# Altium PCB Optical_Sensor.PcbDoc
Units mil, origin at the board's own origin, x right, y up, seen from the top; angles counter-clockwise.
Board outline 472.44 x 708.66 mil, 2 copper layers (Top Layer, Bottom Layer); 5 components, 5 nets, 14 pads, 0 vias.
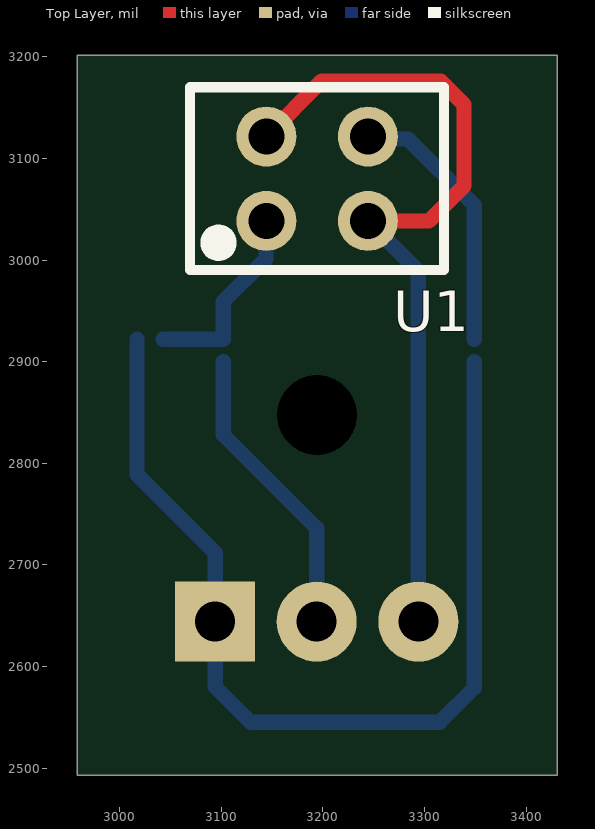
[diagram p0: Top Layer view]
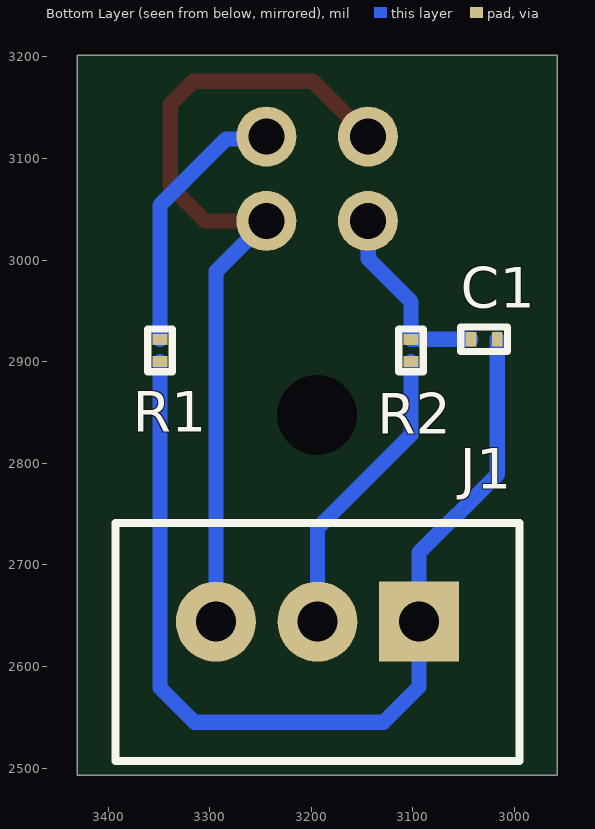
[diagram p1: Bottom Layer view, seen from below]
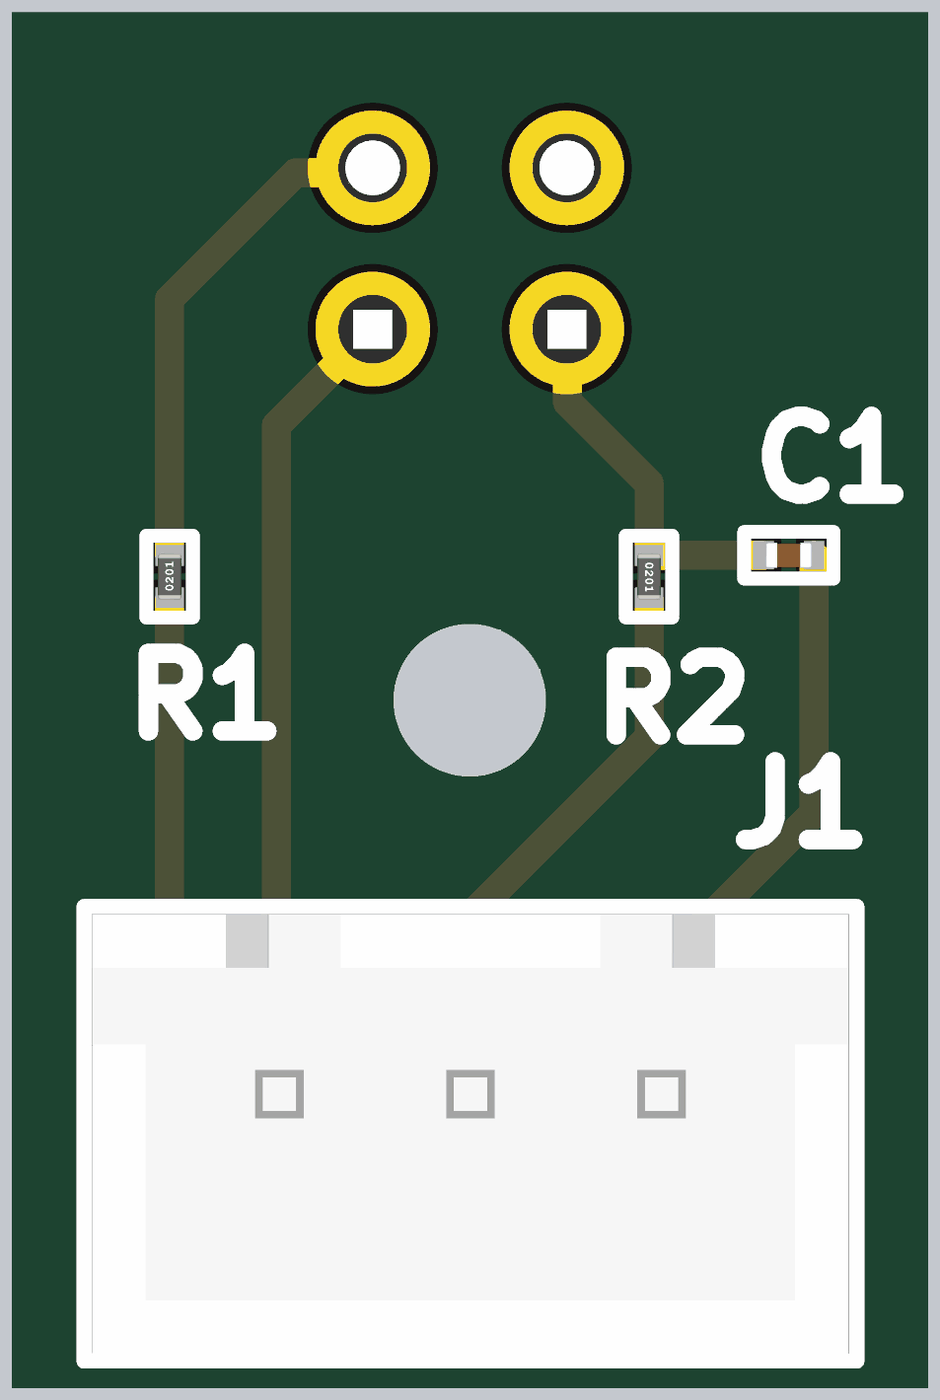
[diagram p2: 3D render of the assembled board from below, using the file's embedded part models]

## Layer stack, top to bottom
Top Solder: solder mask 0.4, Solder Resist, Dk 3.5
Top Layer: signal copper 1.4
Dielectric 1: dielectric 12.6, FR-4, Dk 4.8
Bottom Layer: signal copper 1.4
Bottom Solder: solder mask 0.4, Solder Resist, Dk 3.5

## Board outline
2958.15,2493 3430.59,2493 3430.59,3201.66 2958.15,3201.66

## Design rules (kind name [scope] priority, off if disabled: settings)
Clearance [All] p1: gap=6 ignorepadtopadclearanceinfootprint=TRUE
MinimumSolderMaskSliver [All] p1: minsoldermaskwidth=2
PolygonConnect [All] p1: connectstyle=Relief reliefconductorwidth=10 reliefentries=4 polygonreliefangle="90 Angle" airgapwidth=10
RoutingVias [All] p1: holewidth=28 width=50 viastyle="Through Hole" minholewidth=28 minwidth=50 maxholewidth=28 maxwidth=50
SilkToSilkClearance [All] p1: silktosilkclearance=2
SilkToSolderMaskClearance [IsPad] p1: minsilkscreentomaskgap=1 clearancetoexposedcopper=TRUE
SolderMaskExpansion [All] p1: expansion=4 istentingtop=FALSE soldermaskfromhole=TRUE
Width [All] p1: maxlimit=20 minlimit=10 preferedwidth=10
27 further rules are at their usual default settings.

## Components (designator, comment, footprint, x,y, rotation, side; value= is the part's Value field where it differs from the comment)
C1 "0.01uF" "Cap 0201" 3030,2922 r0 bottom
J1 "B3B-XH-A(LF)(SN)" B3B-XH-A(LF)(SN) 3244,2644 r0 bottom locked
R1 "470R" Res-0201 3349,2911 r90 bottom
R2 "220R" Res-0201 3102,2911 r270 bottom
U1 "QRD1114" QRD1114 3194.37,3080 r90 top locked

## Footprints (in the part's own frame and the unit in brackets; to place one, negate y for a bottom-side part, rotate by r counter-clockwise, add the part's x,y. Pads: shape width x height; smd on the part's side, far side on the other; paste and mask are expansions set on the pad)
B3B-XH-A(LF)(SN) [mm]
  rect 2x2 hole 1: 1(-3.81,0)
  round 2 hole 1: 2(-1.27,0) 3(1.27,0)
  silkscreen extent -6.32,-2.46 3.78,3.48, body extent -6.22,-2.36 3.68,3.39, height 7
"Cap 0201" [mm]
  rect 0.27x0.37 smd: 1(-0.33,0) 2(0.33,0)
  silkscreen extent -0.58,-0.3 0.58,0.3, body extent -0.3,-0.16 0.3,0.17, height 0.21
QRD1114 [mm]
  round 1.5 hole 0.9: 1(-1.055,1.27) 2(-1.055,-1.27) 3(1.055,-1.27) 4(1.055,1.27)
  silkscreen extent -2.29,-3.17 2.29,3.17, body extent -2.2,-3.05 2.2,3.05, height 4.65
Res-0201 [mm]
  rect 0.27x0.37 smd: 1(-0.275,0) 2(0.275,0)
  silkscreen extent -0.53,-0.3 0.53,0.3, body extent -0.3,-0.15 0.3,0.15, height 0.29

## Part data
C1: library part GRM033R61C103KA12D, "CAP CER 10000PF 16V X5R 0201", Capacitance=10nF, Case Code (Imperial)=0201, Case Code (Metric)=0603, Dielectric=X5R, Manufacturer=Murata, Max Operating Temperature=85°C, Min Operating Temperature=-55°C, Package Quantity=1, Supplier Part Number 1=490-7223-1-ND, Tolerance=10%, Voltage Rating=16V, Case/Package=0201, Category="Ceramic Capacitors", ComponentLink1Description=https://datasheet.ciiva.com/18700/grm033r61c103ka12-01-18700237.pdf?src-supplier=Digi-Key, ComponentLink1URL=https://datasheet.ciiva.com/18700/grm033r61c103ka12-01-18700237.pdf?src-supplier=Digi-Key, ComponentLink2Description=https://datasheet.ciiva.com/24221/c02e-24221098.pdf?src-supplier=Mouser, ComponentLink2URL=https://datasheet.ciiva.com/24221/c02e-24221098.pdf?src-supplier=Mouser, ComponentLink3Description=https://datasheet.ciiva.com/18700/partnumbering-e-01-18700238.pdf?src-supplier=Digi-Key, ComponentLink3URL=https://datasheet.ciiva.com/18700/partnumbering-e-01-18700238.pdf?src-supplier=Digi-Key, ComponentLink4Description=https://datasheet.ciiva.com/18700/partnumbering-e-01-18700239.pdf?src-supplier=Digi-Key, ComponentLink4URL=https://datasheet.ciiva.com/18700/partnumbering-e-01-18700239.pdf?src-supplier=Digi-Key, Height=0.3mm, Lead Free="Lead Free", Length=0.024inch, Manufacturer Part Number=GRM033R61C103KA12D, Mount="Surface Mount", Packaging="Tape and Reel", Pricing 1="1=0.10000, 10=0.01700, 50=0.00920, 100=0.00750, 500=0.00540, 1000=0.00424, 2500=0.00385, 5000=0.00354 (USD)", RoHS=Yes, Stock 1=492163, Supplier 1=Digi-Key, Termination=SMD/SMT, Thickness=0.013inch, Voltage Rating (DC)=16V, Weight=1.2E-05oz, Width=0.3mm
J1: "CONN HEADER VERT 3POS 2.5MM", Color=Natural, Contact Resistance=20mR, Current Rating=3A, Housing Color=White, Insulation Resistance=1GR, Manufacturer=JST, Max Operating Temperature=85°C, Max Voltage Rating (AC)=250V, Min Operating Temperature=-25°C, Supplier Part Number 1=1516277, Category="Headers and Wire Housings", ComponentLink1Description=https://datasheet.ciiva.com/26894/getdatasheetpartid-640434-26894454.pdf?src-supplier=Verical, ComponentLink1URL=https://datasheet.ciiva.com/26894/getdatasheetpartid-640434-26894454.pdf?src-supplier=Verical, ComponentLink2Description=https://datasheet.ciiva.com/11746/0900766b8082653f-11746520.pdf?src-supplier=RSComponents, ComponentLink2URL=https://datasheet.ciiva.com/11746/0900766b8082653f-11746520.pdf?src-supplier=RSComponents, ComponentLink3Description=https://datasheet.ciiva.com/26894/getdatasheetpartid-440399-26894778.pdf?src-supplier=Verical, ComponentLink3URL=https://datasheet.ciiva.com/26894/getdatasheetpartid-440399-26894778.pdf?src-supplier=Verical, Connector Type="Male Pin", Contact Material=Brass, Contact Plating=Tin,Lead,Copper, Depth=5.75mm, Fastening Type=Detent, Gender=Male, Housing Material=Polyamide, Lead Free="Lead Free", Lead Pitch=2.5mm, Length=9.9mm, Manufacturer Part Number=B3B-XH-A(LF)(SN), Max Current Rating=3A, Max Voltage Rating (DC)=250V, Mount="Through Hole", Number of Contacts=3, Number of Positions=3, Number of Rows=1, Orientation=Straight, Packaging=Bulk, Pitch=2.5mm, Pricing 1="100=0.09250, 500=0.07700, 1000=0.06470, 2500=0.06340, 5000=0.06210, 10000=0.06080 (GBP)", REACH SVHC="No SVHC", RoHS=Yes, Stock 1=114254, Supplier 1=Farnell, Termination=Press-Fit, Voltage Rating=250V, Voltage Rating (AC)=250V, Wire/Cable Gauge=22AWG
R1: library part RC0201JR-07470RL, "Res Thick Film 0201 470 Ohm 5% 0.05W(1/20W) ±200ppm/C Molded SMD Paper T/R", Case Code (Imperial)=0201, Case Code (Metric)=0603, Manufacturer=Yageo, Max Operating Temperature=125°C, Max Power Dissipation=50mW, Min Operating Temperature=-55°C, Package Quantity=1, Resistor Type="Thick Film", Supplier Part Number 1=311-470NCT-ND, Temperature Coefficient=200ppm/°C, Tolerance=5%, Voltage Rating=25V, Case/Package=0201, Category="Chip SMD Resistors", ComponentLink1Description=https://datasheet.ciiva.com/5924/443682-5924928.pdf?src-supplier=Farnell, ComponentLink1URL=https://datasheet.ciiva.com/5924/443682-5924928.pdf?src-supplier=Farnell, ComponentLink2Description=https://datasheet.ciiva.com/8885/pyu-rc0201-51-rohs-l-8-8885600.pdf?src-supplier=Avnet, ComponentLink2URL=https://datasheet.ciiva.com/8885/pyu-rc0201-51-rohs-l-8-8885600.pdf?src-supplier=Avnet, ComponentLink3Description=https://datasheet.ciiva.com/28390/pyu-rc0201-51-rohs-l-8-28390376.pdf?src-supplier=Avnet+Europe, ComponentLink3URL=https://datasheet.ciiva.com/28390/pyu-rc0201-51-rohs-l-8-28390376.pdf?src-supplier=Avnet+Europe, ComponentLink4Description=https://datasheet.ciiva.com/8885/pyu-rc0201-51-rohs-l-8-8885642.pdf?src-supplier=Avnet, ComponentLink4URL=https://datasheet.ciiva.com/8885/pyu-rc0201-51-rohs-l-8-8885642.pdf?src-supplier=Avnet, ComponentLink5Description=https://datasheet.ciiva.com/2462/pyu-r-int-thick-7-2462802.pdf?src-supplier=Digi-Key, ComponentLink5URL=https://datasheet.ciiva.com/2462/pyu-r-int-thick-7-2462802.pdf?src-supplier=Digi-Key, ComponentLink6Description=https://datasheet.ciiva.com/2462/pyu-r-int-thick-7-2462803.pdf?src-supplier=Digi-Key, ComponentLink6URL=https://datasheet.ciiva.com/2462/pyu-r-int-thick-7-2462803.pdf?src-supplier=Digi-Key, ComponentLink7Description=https://datasheet.ciiva.com/2462/pyu-r-int-thick-7-2462804.pdf?src-supplier=Digi-Key, ComponentLink7URL=https://datasheet.ciiva.com/2462/pyu-r-int-thick-7-2462804.pdf?src-supplier=Digi-Key, Contact Plating=Tin,Matte, Depth=0.3mm, Features="Moisture Resistant", Height=0.01inch, Lead Free="Lead Free", Length=0.6mm, Manufacturer Part Number=RC0201JR-07470RL, Military Standard=Not, Number of Pins=2, Number of Terminations=2, Packaging="Tape and Reel", Power Rating=50mW, Pricing 1="1=0.10000, 10=0.02600, 100=0.01040, 1000=0.00466, 2500=0.00405, 5000=0.00334 (USD)", Radiation Hardening=No, REACH SVHC="No SVHC", Resistance=470R, RoHS=Yes, Stock 1=173754, Supplier 1=Digi-Key, Termination=SMD/SMT, Voltage Rating (DC)=25V, Width=0.3mm
R2: library part RC0201FR-07220RL, "Res Thick Film 0201 220 Ohm 1% 1/20W ±200ppm/°C Molded SMD SMD Paper T/R", Case Code (Imperial)=0201, Case Code (Metric)=0603, Manufacturer=Yageo, Max Operating Temperature=125°C, Max Power Dissipation=50mW, Min Operating Temperature=-55°C, Resistor Type="Thick Film", Supplier Part Number 1=YAG2509CT-ND, Temperature Coefficient=200ppm/°C, Tolerance=1%, Voltage Rating=25V, Case/Package=0201, Category="Chip SMD Resistors", ComponentLink1Description=https://datasheet.ciiva.com/7672/1563626-7672213.pdf?src-supplier=Element14, ComponentLink1URL=https://datasheet.ciiva.com/7672/1563626-7672213.pdf?src-supplier=Element14, ComponentLink2Description=https://datasheet.ciiva.com/8886/pyu-rc0201-51-rohs-l-8-8886758.pdf?src-supplier=Avnet, ComponentLink2URL=https://datasheet.ciiva.com/8886/pyu-rc0201-51-rohs-l-8-8886758.pdf?src-supplier=Avnet, ComponentLink3Description=https://datasheet.ciiva.com/16855/pyu-rc0201-51-rohs-l-8-16855847.pdf?src-supplier=Avnet+Europe, ComponentLink3URL=https://datasheet.ciiva.com/16855/pyu-rc0201-51-rohs-l-8-16855847.pdf?src-supplier=Avnet+Europe, ComponentLink4Description=https://datasheet.ciiva.com/28393/pyu-rc0201-51-rohs-l-8-28393063.pdf?src-supplier=Avnet+Europe, ComponentLink4URL=https://datasheet.ciiva.com/28393/pyu-rc0201-51-rohs-l-8-28393063.pdf?src-supplier=Avnet+Europe, Contact Plating=Tin,Matte, Depth=0.3mm, Features="Moisture Resistant", Height=0.01inch, Length=0.6mm, Manufacturer Part Number=RC0201FR-07220RL, Military Standard=Not, Number of Terminations=2, Packaging="Tape and Reel", Power Rating=50mW, Pricing 1="1=0.10000, 10=0.03600, 100=0.01480, 1000=0.00665, 2500=0.00577, 5000=0.00477 (USD)", Radiation Hardening=No, REACH SVHC=Unknown, Resistance=220R, RoHS=Yes, Stock 1=189347, Supplier 1=Digi-Key, Termination=SMD/SMT, Width=0.012inch
U1: "QRD1114 Series 30 V 50 mA Phototransistor Reflective Object Sensor", Collector Emitter Breakdown Voltage=30V, Forward Current=50mA, Forward Voltage=1.7V, Input Current=20mA, Manufacturer="ON Semiconductor / Fairchild", Max Collector Current=1mA, Max Operating Temperature=85°C, Max Power Dissipation=100mW, Min Operating Temperature=-40°C, Package Quantity=100, Reverse Breakdown Voltage=5V, Supplier Part Number 1=QRD1114-ND, Category=Optocouplers, Collector Emitter Voltage (VCEO)=30V, ComponentLink1Description=https://datasheet.ciiva.com/12069/qrd1114-192054-12069087.pdf?src-supplier=Mouser, ComponentLink1URL=https://datasheet.ciiva.com/12069/qrd1114-192054-12069087.pdf?src-supplier=Mouser, ComponentLink2Description=https://datasheet.ciiva.com/19453/874939-19453556.pdf?src-supplier=Jameco, ComponentLink2URL=https://datasheet.ciiva.com/19453/874939-19453556.pdf?src-supplier=Jameco, ComponentLink3Description=https://datasheet.ciiva.com/2823/qrd1113-2823879.pdf?src-supplier=Digi-Key, ComponentLink3URL=https://datasheet.ciiva.com/2823/qrd1113-2823879.pdf?src-supplier=Digi-Key, ComponentLink4Description=https://datasheet.ciiva.com/26165/qrd1113-26165833.pdf?src-supplier=Avnet+Europe, ComponentLink4URL=https://datasheet.ciiva.com/26165/qrd1113-26165833.pdf?src-supplier=Avnet+Europe, ComponentLink5Description=https://datasheet.ciiva.com/3305/qrd1113-3305733.pdf?src-supplier=Avnet, ComponentLink5URL=https://datasheet.ciiva.com/3305/qrd1113-3305733.pdf?src-supplier=Avnet, ComponentLink6Description=https://datasheet.ciiva.com/17088/qrd1113-17088344.pdf?src-supplier=Future+Electronics, ComponentLink6URL=https://datasheet.ciiva.com/17088/qrd1113-17088344.pdf?src-supplier=Future+Electronics, Contact Plating=Tin,Matte, Fall Time=50000ns, Height=4.65mm, Lead Free="Lead Free", Length=6.1mm, Manufacturer Part Number=QRD1114, Mount="Through Hole", Number of Channels=1, Number of Elements=1, Number of Pins=4, Operating Supply Voltage=1.7V, Output Type=Phototransistor, Packaging=Bulk, Power Dissipation=100mW, Pricing 1="1=1.64000, 5=1.58000, 10=1.28400, 25=1.10600, 50=0.95780, 100=0.86900, 500=0.73076, 1000=0.65175, 5000=0.59250 (USD)", Radiation Hardening=No, REACH SVHC="No SVHC", Response Time=50us, Reverse Voltage (DC)=5V, Rise Time=10000ns, RoHS=Yes, Sensing Distance=1.27mm, Stock 1=4356, Supplier 1=Digi-Key, Wavelength=940nm, Weight=0g, Width=4.39mm

## Free pads (board coordinates)
  round 0 hole 78.74 unplated mask+0: MH(3194.37,2847.33)

## Nets (pads, with @x,y where several pads share a name; then routed paths per layer and width w, separated by ;. In a path a pad name is that pad's centre, name@x,y a point inside that pad or via, vN(x,y) a via of type N, cw(c..) or ccw(c..) an arc to the next point about the centre after c; other vN are vias at no path point)
GND: J1.3 U1.2 U1.4 | length 830.7
  Top Layer w15: U1.4 3198.83,3176 3316,3176 3339,3153 3339,3073 3304.46,3038.46 U1.2
  Bottom Layer w15: U1.2 3294,2988.83 J1.3
NetC1_2: C1.2 R2.1 U1.1 | length 193.3
  Bottom Layer w10: R2.1@3101.83,2922 R2.1 ; U1.1@3144,3038.09 U1.1
  Bottom Layer w15: C1.2 R2.1@3101.83,2922 ; R2.1 3102,2959 3144,3001 U1.1@3144,3038.09
NetR1_2: R1.2 U1.3 | length 264.8
  Bottom Layer w15: U1.3 3246.91,3119 3284,3119 3349,3054 R1.2
Signal_: J1.2 R2.2 | length 294.3
  Bottom Layer w15: R2.2 3102,2828 3194,2736 J1.2
VCC: C1.1 J1.1 R1.1 | length 978.6
  Bottom Layer w15: C1.1 3017.01,2788.99 3094,2712 J1.1 3094,2580 3129,2545 3315,2545 3349,2579 R1.1

## Silkscreen, mask and mechanical layers (free items; w line width, h text height)
Mechanical 2:
  the board outline again, w10